# Altium PCB Switch_Matrix_32_2.PCBDOC (part 5 of 9)
Units mm, origin at the board's own origin, x right, y up, seen from the top; angles counter-clockwise.
Board outline 222.54 x 100 mm, 6 copper layers (L1, P2, L3, P4, L5, L6), stack 1.61 mm thick; 629 components, 583 nets, 2332 pads, 825 vias.
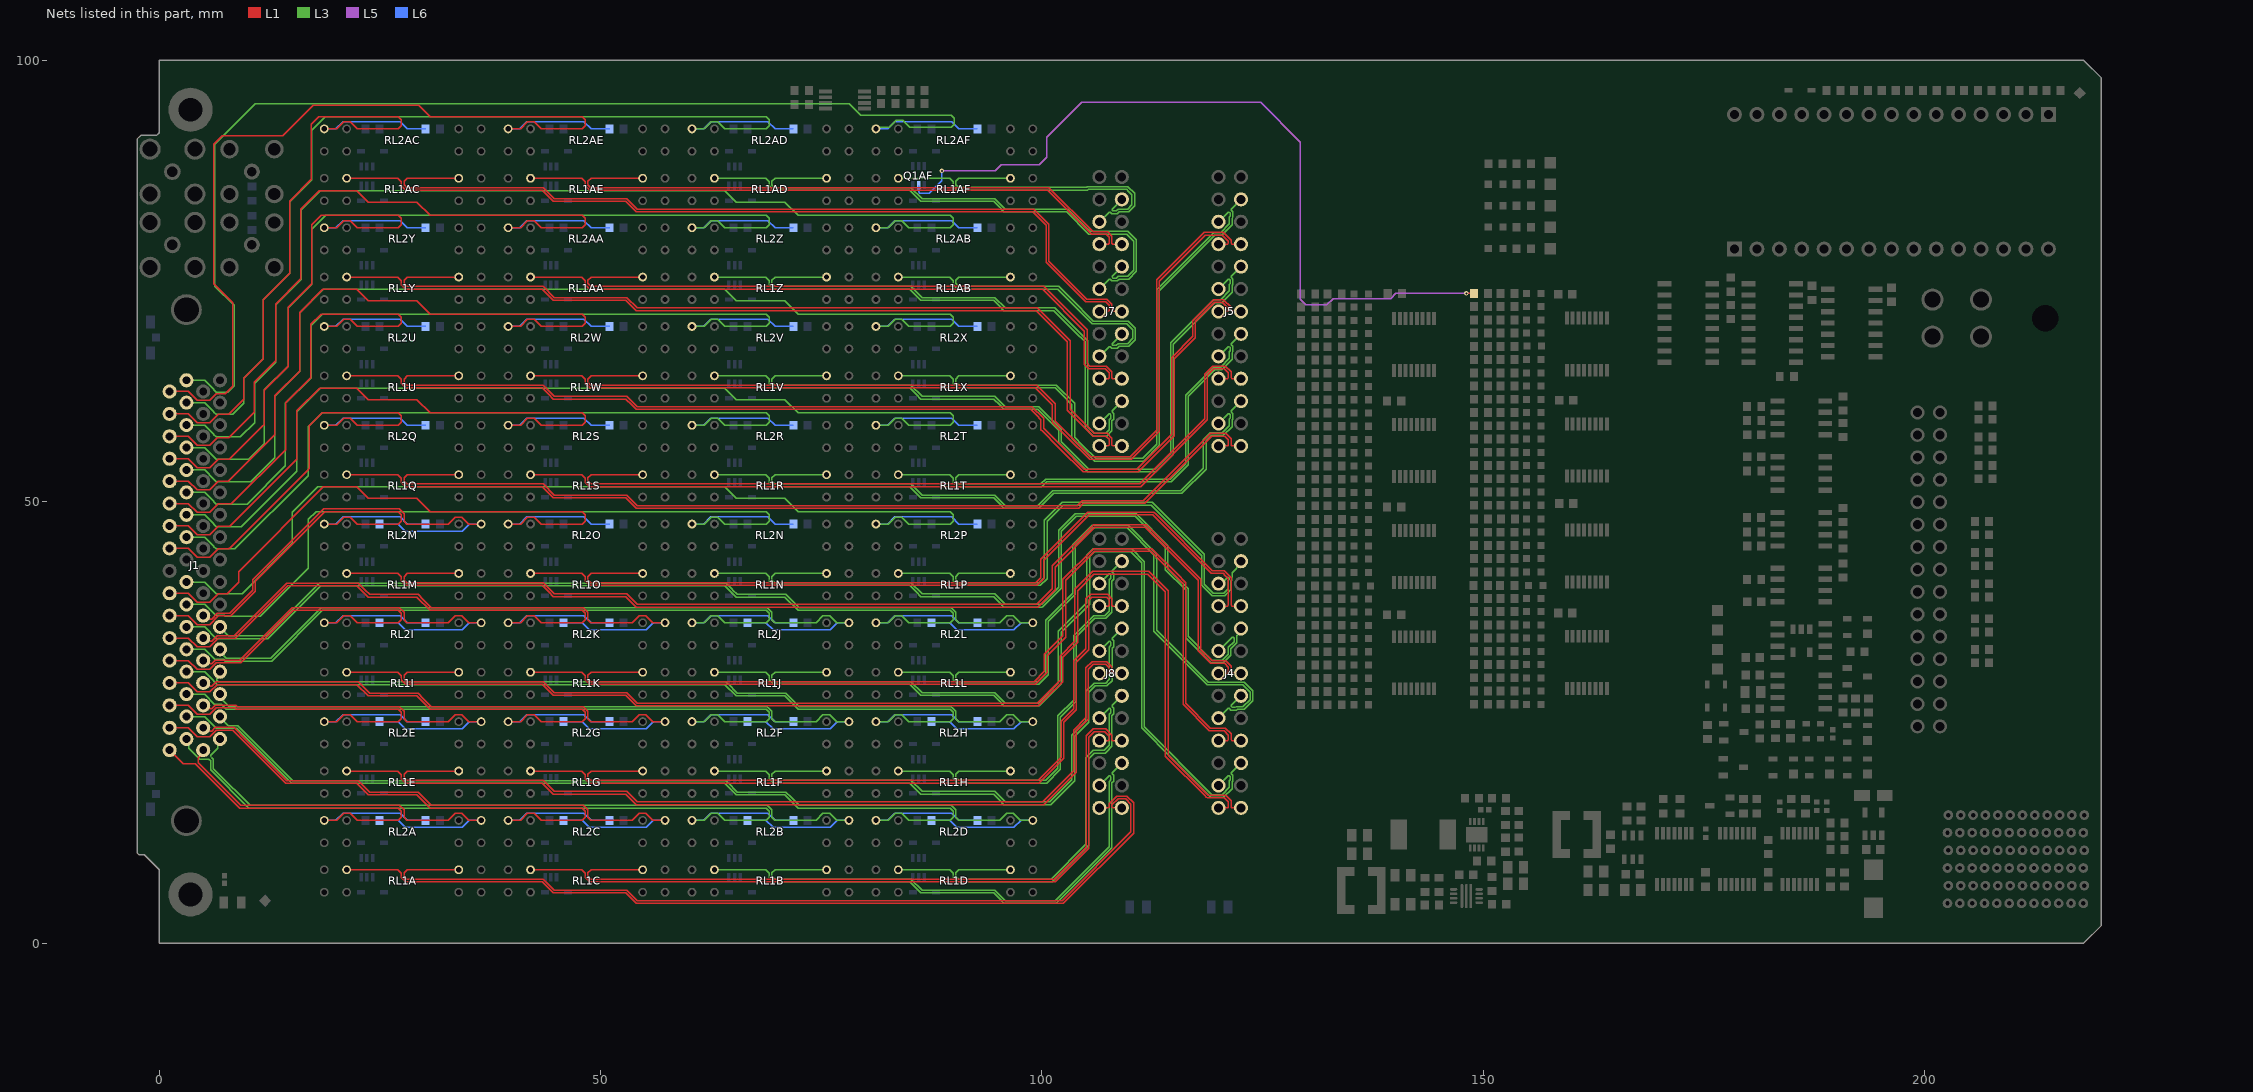
[diagram p8: the nets of this part, all layers, seen from the top]

## Via types
v1: diameter 0.5, hole 0.2, L1 to L6, tented both sides, 775 vias
v2: diameter 0.7, hole 0.4, L1 to L6, tented both sides, 41 vias
v3: diameter 0.5, hole 0.2, L1 to L6, 5 vias
v4: diameter 0.6, hole 0.3, L1 to L6, tented both sides, 4 vias

## Nets (pads, with @x,y where several pads share a name; then routed paths per layer and width w, separated by ;. In a path a pad name is that pad's centre, name@x,y a point inside that pad or via, vN(x,y) a via of type N, cw(c..) or ccw(c..) an arc to the next point about the centre after c; other vN are vias at no path point) (continued)
CTRL32B: Q1AF.2 R68B.2 | length 90.4
  L1 w0.152: v1(148.1,73.6) R68B.2@148.95,73.6
  L5 w0.152: v1(88.682,87.478) 94.704,87.478 95.397,88.171 99.702,88.171 100.531,89 100.531,91.282 104.505,95.256 124.772,95.256 129.289,90.739 129.289,72.911 129.9,72.3 132.3,72.3 133,73 139.5,73 140.1,73.6 v1(148.1,73.6)
  L6 w0.152: Q1AF.2@86.035,85.778 86.035,85.112 86.192,84.955 87.264,84.955 88.682,86.373 v1(88.682,87.478)
DAC_IN_N1: J8.2 RL1A.7 | length 102.7
  L1 w0.152: RL1A.7@21.234,8.3 27.031,8.3 27.432,7.899 27.432,7.448 27.945,6.935 43.37,6.935 44.107,6.198 44.63,5.675 52.859,5.675 53.534,5 54.039,4.495 102.426,4.495 110.391,12.46 110.391,15.868 109.61,16.65 108.505,16.65 107.635,15.779 107.635,15.405 107.546,15.316 J8.2@106.517,15.316
DAC_IN_N2: J8.5 RL1B.7 | length 59.7
  L3 w0.152: RL1B.7@62.906,8.3 68.703,8.3 69.104,7.899 69.104,7.448 69.617,6.935 85.042,6.935 85.779,6.198 86.302,5.675 94.531,5.675 95.206,5 95.711,4.495 101.626,4.495 107.935,10.804 107.935,18.153 108.137,18.354 108.137,18.992 107.958,19.171 107.958,19.297 J8.5@109.057,20.396
DAC_IN_N3: J8.8 RL1C.7 | length 82.6
  L1 w0.152: RL1C.7@42.07,8.3 47.867,8.3 48.268,7.899 48.268,7.448 48.781,6.935 101.526,6.935 105.326,10.735 105.326,23.335 105.956,23.965 107.113,23.965 107.635,23.443 107.635,23.025 107.546,22.936 J8.8@106.517,22.936
DAC_IN_N4: J8.11 RL1D.7 | length 43.5
  L3 w0.152: RL1D.7@83.742,8.3 89.539,8.3 89.94,7.899 89.94,7.448 90.453,6.935 101.166,6.935 105.305,11.074 105.305,20.874 105.949,21.518 107.17,21.518 107.349,21.697 107.93,22.279 107.93,25.768 108.137,25.974 108.137,26.612 107.958,26.791 107.958,26.917 J8.11@109.057,28.016
DAC_IN_N5: J8.14 RL1E.7 | length 102.7
  L1 w0.152: RL1E.7@21.234,19.492 27.031,19.492 27.432,19.091 27.432,18.64 27.945,18.127 43.37,18.127 44.107,17.39 44.63,16.867 52.859,16.867 53.534,16.192 54.039,15.687 100.214,15.687 100.392,15.866 103.721,19.195 103.9,19.374 103.9,24 105.271,25.371 105.271,31.04 105.815,31.585 107.213,31.585 107.635,31.163 107.635,30.645 107.546,30.556 J8.14@106.517,30.556
DAC_IN_N6: J8.17 RL1F.7 | length 64.1
  L3 w0.152: RL1F.7@62.906,19.492 68.703,19.492 69.104,19.091 69.104,18.64 69.617,18.127 85.042,18.127 85.779,17.39 86.302,16.867 94.531,16.867 95.206,16.192 95.711,15.687 101.018,15.687 103.705,18.374 103.705,23.405 105.126,24.826 105.305,25.005 105.305,28.387 106.047,29.13 107.337,29.13 107.951,29.743 107.951,33.408 108.137,33.594 108.137,34.232 107.958,34.411 107.958,34.537 J8.17@109.057,35.636
DAC_IN_N7: J8.20 RL1G.7 | length 85.9
  L1 w0.152: RL1G.7@42.07,19.492 47.867,19.492 48.268,19.091 48.268,18.64 48.781,18.127 99.713,18.127 99.891,18.306 102.326,20.741 102.505,20.919 102.505,25.005 103.905,26.405 103.905,31.836 105.126,33.057 105.305,33.236 105.305,38.855 105.655,39.205 107.33,39.205 107.635,38.9 107.635,38.265 107.546,38.176 J8.20@106.517,38.176
DAC_IN_N8: J8.23 RL1H.7 | length 47.2
  L3 w0.152: RL1H.7@83.742,19.492 89.539,19.492 89.94,19.091 89.94,18.64 90.453,18.127 100.558,18.127 102.105,19.674 102.105,25.605 103.726,27.226 103.905,27.405 103.905,34.685 105.993,36.773 107.231,36.773 107.753,37.296 107.932,37.474 107.932,41.009 108.137,41.214 108.137,41.852 107.958,42.031 107.958,42.157 J8.23@109.057,43.256
DAC_IN_N9: J4.2 RL1I.7 | length 136.3
  L1 w0.152: RL1I.7@21.234,30.684 27.031,30.684 27.432,30.283 27.432,29.832 27.945,29.319 43.37,29.319 44.107,28.582 44.63,28.059 52.859,28.059 53.534,27.384 54.039,26.879 99.618,26.879 100.563,27.824 102.364,29.625 102.364,32.382 103.862,33.88 104.04,34.058 104.04,39.938 105.902,41.8 112,41.8 114,39.8 114,21.158 114.179,20.979 118.431,16.727 118.628,16.53 118.717,16.441 120.693,16.441 121.135,15.999 121.135,15.405 121.046,15.316 J4.2@120.017,15.316
DAC_IN_N10: J4.5 RL1J.7 | length 100.7
  L3 w0.152: RL1J.7@62.906,30.684 68.703,30.684 69.104,30.283 69.104,29.832 69.617,29.319 85.042,29.319 85.779,28.582 86.302,28.059 94.531,28.059 95.206,27.384 95.711,26.879 99.71,26.879 102.19,29.359 102.19,35.19 105.405,38.405 105.405,43.807 105.955,44.358 110.042,44.358 110.2,44.2 111.3,43.1 111.3,24.369 114.784,20.884 119.146,16.523 120.57,16.523 121.554,17.507 121.554,18.272 121.637,18.354 121.637,18.992 121.458,19.171 121.458,19.297 J4.5@122.557,20.396
DAC_IN_N11: J4.8 RL1K.7 | length 109.3
  L1 w0.152: RL1K.7@42.07,30.684 47.867,30.684 48.268,30.283 48.268,29.832 48.781,29.319 99.262,29.319 100.605,30.662 100.605,32.574 102.514,34.483 102.692,34.662 102.692,41.083 105.979,44.37 112.33,44.37 115.1,41.6 116,40.7 116,27.035 116.179,26.856 118.801,24.234 118.98,24.055 120.647,24.055 121.135,23.567 121.135,23.025 121.046,22.936 J4.8@120.017,22.936
DAC_IN_N12: J4.11 RL1L.7 | length 72.6
  L3 w0.152: RL1L.7@83.742,30.684 89.539,30.684 89.94,30.283 89.94,29.832 90.453,29.319 99.65,29.319 100.731,30.399 100.731,36.46 103.608,39.337 103.786,39.516 103.786,44.987 105.835,47.036 109.665,47.036 112.689,44.012 112.689,35.311 118.752,29.248 122.78,29.248 123.586,28.442 123.586,27.59 122.78,26.784 122.016,26.784 121.933,26.702 121.548,26.702 121.458,26.791 121.458,26.917 J4.11@122.557,28.016
DAC_IN_N13: J4.14 RL1M.7 | length 120
  L1 w0.152: RL1M.7@21.234,41.876 27.031,41.876 27.432,41.475 27.432,41.024 27.945,40.511 43.37,40.511 44.107,39.774 44.63,39.251 52.859,39.251 53.534,38.576 54.039,38.071 99.53,38.071 101.5,40.041 101.5,42.6 106,47.1 111.7,47.1 117.7,41.1 117.7,33.13 117.879,32.951 118.973,31.857 119.151,31.678 120.701,31.678 121.135,31.244 121.135,30.645 121.046,30.556 J4.14@120.017,30.556
DAC_IN_N14: J4.17 RL1N.7 | length 83.8
  L3 w0.152: RL1N.7@62.906,41.876 68.703,41.876 69.104,41.475 69.104,41.024 69.617,40.511 85.042,40.511 85.779,39.774 86.302,39.251 94.531,39.251 95.206,38.576 95.711,38.071 100.034,38.071 100.06,38.097 100.114,38.097 100.278,38.26 102.049,40.032 102.213,40.195 102.213,46.646 103.903,48.336 110.586,48.336 114,44.923 114,42.295 116.295,40 116.295,34.606 116.474,34.427 119.138,31.763 120.57,31.763 121.407,32.6 121.407,33.364 122.075,34.032 122.075,34.823 122.557,35.306 J4.17@122.557,35.636
DAC_IN_N15: J4.20 RL1O.7 | length 91.6
  L1 w0.152: RL1O.7@42.07,41.876 47.867,41.876 48.268,41.475 48.268,41.024 48.781,40.511 99.442,40.511 100.205,41.274 100.205,43.356 105.347,48.498 112.571,48.498 119.2,41.87 120.53,41.87 120.8,41.6 121.135,41.265 121.135,38.265 121.046,38.176 J4.20@120.017,38.176
DAC_IN_N16: J4.23 RL1P.7 | length 56.3
  L3 w0.152: RL1P.7@83.742,41.876 89.539,41.876 89.94,41.475 89.94,41.024 90.453,40.511 99.842,40.511 100.605,41.274 100.605,47.798 102.435,49.628 112.372,49.628 118.095,43.905 118.095,40.541 118.274,40.363 119.107,39.53 119.286,39.351 120.731,39.351 121.421,40.04 121.421,40.998 121.54,41.118 121.54,41.42 121.58,41.459 121.58,41.98 122.557,42.957 J4.23@122.557,43.256
DAC_IN_N17: J5.2 RL1Q.7 | length 107.1
  L1 w0.152: RL1Q.7@21.234,53.068 27.031,53.068 27.432,52.667 27.432,52.216 27.945,51.703 43.37,51.703 44.107,50.966 44.63,50.443 52.859,50.443 53.534,49.768 54.039,49.263 104.163,49.263 104.7,49.8 111.631,49.8 119.27,57.439 120.727,57.439 121.135,57.031 121.135,56.405 121.046,56.316 J5.2@120.017,56.316
DAC_IN_N18: J5.5 RL1R.7 | length 69.7
  L3 w0.152: RL1R.7@62.906,53.068 68.703,53.068 69.104,52.667 69.104,52.216 69.617,51.703 85.042,51.703 85.779,50.966 86.302,50.443 94.531,50.443 95.206,49.768 95.711,49.263 99.663,49.263 101.338,50.938 115.869,50.938 118.605,53.674 118.605,56.9 119.228,57.523 120.57,57.523 121.554,58.507 121.554,59.272 121.637,59.354 121.637,59.992 121.458,60.171 121.458,60.297 J5.5@122.557,61.396
DAC_IN_N19: J5.8 RL1S.7 | length 90.3
  L1 w0.152: RL1S.7@42.07,53.068 47.867,53.068 48.268,52.667 48.268,52.216 48.781,51.703 111.195,51.703 118.583,59.092 118.762,59.27 118.762,64.321 119.501,65.06 120.677,65.06 121.135,64.602 121.135,64.025 121.046,63.936 J5.8@120.017,63.936
DAC_IN_N20: J5.11 RL1T.7 | length 52.6
  L3 w0.152: RL1T.7@83.742,53.068 89.539,53.068 89.94,52.667 89.94,52.216 90.453,51.703 100.003,51.703 100.548,52.248 114.679,52.248 116.605,54.174 116.605,61.942 119.602,64.939 120.366,64.939 121.554,66.127 121.554,66.892 121.637,66.974 121.637,67.612 121.458,67.791 121.458,67.917 J5.11@122.557,69.016
DAC_IN_N21: J5.14 RL1U.7 | length 121.1
  L1 w0.152: RL1U.7@21.234,64.26 27.031,64.26 27.432,63.859 27.432,63.408 27.945,62.895 43.37,62.895 44.107,62.158 44.63,61.635 52.859,61.635 53.534,60.96 54.039,60.455 98.745,60.455 99.4,59.8 99.895,59.305 99.895,58.174 100.074,57.995 101.815,56.254 102.102,55.967 104.674,53.395 110.906,53.395 111.084,53.574 114.826,57.316 115.005,57.494 115.005,66.2 117.406,68.601 117.406,70.399 119.591,72.585 120.443,72.585 121.135,71.893 121.135,71.645 121.046,71.556 J5.14@120.017,71.556
DAC_IN_N22: J5.17 RL1V.7 | length 83.5
  L3 w0.152: RL1V.7@62.906,64.26 68.703,64.26 69.104,63.859 69.104,63.408 69.617,62.895 85.042,62.895 85.779,62.158 86.302,61.635 94.531,61.635 95.206,60.96 95.711,60.455 99.54,60.455 101.895,58.1 101.895,56.674 105.186,53.383 112.914,53.383 114.905,55.374 114.905,67.862 119.602,72.559 120.366,72.559 121.554,73.747 121.554,74.512 121.637,74.594 121.637,75.232 121.458,75.411 121.458,75.537 J5.17@122.557,76.636
DAC_IN_N23: J5.20 RL1W.7 | length 106.6
  L1 w0.152: RL1W.7@42.07,64.26 47.867,64.26 48.268,63.859 48.268,63.408 48.781,62.895 99.278,62.895 101.195,60.978 101.195,59.014 101.374,58.836 102.878,57.332 105.414,54.795 110.113,54.795 110.292,54.974 113.128,57.81 113.307,57.988 113.307,74.993 118.518,80.205 120.443,80.205 121.135,79.513 121.135,79.265 121.046,79.176 J5.20@120.017,79.176
DAC_IN_N24: J5.23 RL1X.7 | length 69.1
  L3 w0.152: RL1X.7@83.742,64.26 89.539,64.26 89.94,63.859 89.94,63.408 90.453,62.895 101.505,62.895 102.3,62.1 103.395,61.005 103.395,57.174 105.969,54.6 111.531,54.6 113.305,56.374 113.305,73.882 119.602,80.179 120.366,80.179 121.554,81.367 121.554,82.132 121.637,82.214 121.637,82.852 121.458,83.031 121.458,83.157 J5.23@122.557,84.256
DAC_IN_N25: J7.2 RL1Y.7 | length 100.6
  L1 w0.152: RL1Y.7@21.234,75.452 27.031,75.452 27.432,75.051 27.432,74.6 27.945,74.087 43.37,74.087 44.107,73.35 44.63,72.827 52.859,72.827 53.534,72.152 54.039,71.647 99.353,71.647 99.9,71.1 102.9,68.1 102.9,60.364 105.829,57.436 107.259,57.436 107.635,57.06 107.635,56.405 107.546,56.316 J7.2@106.517,56.316
DAC_IN_N26: J7.5 RL1Z.7 | length 62.7
  L3 w0.152: RL1Z.7@62.906,75.452 68.703,75.452 69.104,75.051 69.104,74.6 69.617,74.087 85.042,74.087 85.779,73.35 86.302,72.827 94.531,72.827 95.206,72.152 95.711,71.647 101.353,71.647 103.8,69.2 104.895,68.105 104.895,58.374 105.829,57.44 107.34,57.44 107.932,58.032 107.932,59.149 108.137,59.354 108.137,59.992 107.958,60.171 107.958,60.297 J7.5@109.057,61.396
DAC_IN_N27: J7.8 RL1AA.7 | length 74.3
  L1 w0.152: RL1AA.7@42.07,75.452 47.867,75.452 48.268,75.051 48.268,74.6 48.781,74.087 100.082,74.087 104.828,69.341 104.828,65.567 105.327,65.067 107.176,65.067 107.635,64.608 107.635,64.025 107.546,63.936 J7.8@106.517,63.936
DAC_IN_N28: J7.11 RL1AB.7 | length 34.7
  L3 w0.152: RL1AB.7@83.742,75.452 89.539,75.452 89.94,75.051 89.94,74.6 90.453,74.087 101.782,74.087 105.714,70.155 109.645,70.155 110.3,69.5 110.3,68.5 109.707,67.907 108.638,67.907 108.433,67.702 108.048,67.702 107.958,67.791 107.958,67.917 J7.11@109.057,69.016
DAC_IN_N29: J7.14 RL1AC.7 | length 96.8
  L1 w0.152: RL1AC.7@21.234,86.644 27.031,86.644 27.432,86.243 27.432,85.792 27.945,85.279 43.37,85.279 44.107,84.542 44.63,84.019 52.859,84.019 53.534,83.344 54.039,82.839 98.964,82.839 100.495,81.308 100.495,77.129 100.674,76.951 102.874,74.75 103.269,74.356 104.786,72.839 104.964,72.66 107.249,72.66 107.635,72.274 107.635,71.645 107.546,71.556 J7.14@106.517,71.556
DAC_IN_N30: J7.17 RL1AD.7 | length 58.5
  L3 w0.152: RL1AD.7@62.906,86.644 68.703,86.644 69.104,86.243 69.104,85.792 69.617,85.279 85.042,85.279 85.779,84.542 86.302,84.019 94.531,84.019 95.206,83.344 95.711,82.839 102.83,82.839 105.339,80.33 109.599,80.33 110.4,79.528 110.4,76.222 109.705,75.527 108.638,75.527 108.433,75.322 108.048,75.322 107.958,75.411 107.958,75.537 J7.17@109.057,76.636
DAC_IN_N31: J7.20 RL1AE.7 | length 70.5
  L1 w0.152: RL1AE.7@42.07,86.644 47.867,86.644 48.268,86.243 48.268,85.792 48.781,85.279 100.683,85.279 105.499,80.463 105.677,80.285 107.318,80.285 107.635,79.968 107.635,79.265 107.546,79.176 J7.20@106.517,79.176
DAC_IN_N32: J7.23 RL1AF.7 | length 33
  L3 w0.152: RL1AF.7@83.742,86.644 89.539,86.644 89.94,86.243 89.94,85.792 90.437,85.295 105.195,85.295 105.276,85.376 109.624,85.376 109.8,85.2 110.2,84.8 110.2,83.642 109.705,83.147 108.638,83.147 108.433,82.942 108.048,82.942 107.958,83.031 107.958,83.157 J7.23@109.057,84.256
DAC_IN_P1: J8.1 RL1A.6 | length 100.7
  L1 w0.152: RL1A.6@33.934,8.3 28.097,8.3 27.736,7.939 27.736,7.574 28.071,7.24 43.496,7.24 44.756,5.98 52.985,5.98 54.165,4.8 102.3,4.8 110.086,12.586 110.086,15.742 109.483,16.345 108.631,16.345 107.94,15.653 107.94,15.405 108.029,15.316 J8.1@109.057,15.316
DAC_IN_P2: J8.4 RL1B.6 | length 58.4
  L3 w0.152: RL1B.6@75.606,8.3 69.769,8.3 69.408,7.939 69.408,7.574 69.743,7.24 85.168,7.24 86.428,5.98 94.657,5.98 95.837,4.8 101.5,4.8 107.63,10.93 107.63,18.279 107.832,18.481 107.832,18.866 107.743,18.955 107.617,18.955 J8.4@106.517,17.856
DAC_IN_P3: J8.7 RL1C.6 | length 82.6
  L1 w0.152: RL1C.6@54.77,8.3 48.933,8.3 48.572,7.939 48.572,7.574 48.907,7.24 101.4,7.24 105.021,10.861 105.021,23.461 105.829,24.27 107.24,24.27 107.94,23.569 107.94,23.025 108.029,22.936 J8.7@109.057,22.936
DAC_IN_P4: J8.10 RL1D.6 | length 42.2
  L3 w0.152: RL1D.6@96.442,8.3 90.605,8.3 90.244,7.939 90.244,7.574 90.579,7.24 101.04,7.24 105,11.2 105,21 105.823,21.823 107.044,21.823 107.626,22.405 107.626,25.894 107.832,26.101 107.832,26.486 107.743,26.575 107.617,26.575 J8.10@106.517,25.476
DAC_IN_P5: J8.13 RL1E.6 | length 102.7
  L1 w0.152: RL1E.6@33.934,19.492 28.097,19.492 27.736,19.131 27.736,18.766 28.071,18.432 43.496,18.432 44.756,17.172 52.985,17.172 54.165,15.992 100.087,15.992 103.595,19.5 103.595,24.126 104.966,25.497 104.966,31.167 105.689,31.89 107.34,31.89 107.94,31.289 107.94,30.645 108.029,30.556 J8.13@109.057,30.556
DAC_IN_P6: J8.16 RL1F.6 | length 62.9
  L3 w0.152: RL1F.6@75.606,19.492 69.769,19.492 69.408,19.131 69.408,18.766 69.743,18.432 85.168,18.432 86.428,17.172 94.657,17.172 95.837,15.992 100.892,15.992 103.4,18.5 103.4,23.531 105,25.131 105,28.514 105.921,29.435 107.211,29.435 107.646,29.87 107.646,33.535 107.832,33.721 107.832,34.106 107.743,34.195 107.617,34.195 J8.16@106.517,33.096
DAC_IN_P7: J8.19 RL1G.6 | length 85.9
  L1 w0.152: RL1G.6@54.77,19.492 48.933,19.492 48.572,19.131 48.572,18.766 48.907,18.432 99.586,18.432 102.2,21.046 102.2,25.131 103.6,26.531 103.6,31.962 105,33.362 105,38.981 105.529,39.51 107.457,39.51 107.94,39.026 107.94,38.265 108.029,38.176 J8.19@109.057,38.176
DAC_IN_P8: J8.22 RL1H.6 | length 45.9
  L3 w0.152: RL1H.6@96.442,19.492 90.605,19.492 90.244,19.131 90.244,18.766 90.579,18.432 100.432,18.432 101.8,19.8 101.8,25.731 103.6,27.531 103.6,34.811 105.867,37.078 107.105,37.078 107.627,37.601 107.627,41.136 107.832,41.341 107.832,41.726 107.743,41.815 107.617,41.815 J8.22@106.517,40.716
DAC_IN_P9: J4.1 RL1I.6 | length 136.4
  L1 w0.152: RL1I.6@33.934,30.684 28.097,30.684 27.736,30.323 27.736,29.958 28.071,29.624 43.496,29.624 44.756,28.364 52.985,28.364 54.165,27.184 99.492,27.184 102.059,29.751 102.059,32.508 103.735,34.184 103.735,40.064 105.776,42.105 112.126,42.105 114.216,40.016 114.305,39.926 114.305,21.284 118.843,16.746 120.819,16.746 121.44,16.125 121.44,15.405 121.529,15.316 J4.1@122.557,15.316
DAC_IN_P10: J4.4 RL1J.6 | length 99.4
  L3 w0.152: RL1J.6@75.606,30.684 69.769,30.684 69.408,30.323 69.408,29.958 69.743,29.624 85.168,29.624 86.428,28.364 94.657,28.364 95.837,27.184 99.584,27.184 101.885,29.485 101.885,35.316 105.1,38.531 105.1,43.933 105.829,44.663 110.169,44.663 111.605,43.226 111.605,24.495 119.272,16.828 120.443,16.828 121.249,17.634 121.249,18.398 121.332,18.481 121.332,18.866 121.243,18.955 121.117,18.955 J4.4@120.017,17.856
DAC_IN_P11: J4.7 RL1K.6 | length 109.4
  L1 w0.152: RL1K.6@54.77,30.684 48.933,30.684 48.572,30.323 48.572,29.958 48.907,29.624 99.136,29.624 100.3,30.788 100.3,32.701 102.387,34.788 102.387,41.209 105.853,44.675 112.456,44.675 112.545,44.586 115.316,41.816 116.305,40.826 116.305,27.161 119.106,24.36 120.773,24.36 121.44,23.694 121.44,23.025 121.529,22.936 J4.7@122.557,22.936
DAC_IN_P12: J4.10 RL1L.6 | length 73.4
  L3 w0.152: RL1L.6@96.442,30.684 90.605,30.684 90.244,30.323 90.244,29.958 90.579,29.624 99.524,29.624 100.426,30.526 100.426,36.586 103.481,39.642 103.481,44.969 103.507,44.994 103.507,45.12 103.66,45.274 103.678,45.274 105.72,47.315 109.78,47.315 112.968,44.127 112.968,43.537 112.993,43.511 112.993,35.438 118.878,29.553 122.906,29.553 123.891,28.569 123.891,27.464 122.906,26.479 122.142,26.479 122.059,26.397 121.421,26.397 121.243,26.575 121.117,26.575 J4.10@120.017,25.476
DAC_IN_P13: J4.13 RL1M.6 | length 120
  L1 w0.152: RL1M.6@33.934,41.876 28.097,41.876 27.736,41.515 27.736,41.15 28.071,40.816 43.496,40.816 44.756,39.556 52.985,39.556 54.165,38.376 99.403,38.376 101.195,40.168 101.195,42.726 105.874,47.405 111.826,47.405 118.005,41.226 118.005,33.256 119.278,31.983 120.827,31.983 121.44,31.371 121.44,30.645 121.529,30.556 J4.13@122.557,30.556
DAC_IN_P14: J4.16 RL1N.6 | length 83.9
  L3 w0.152: RL1N.6@75.606,41.876 69.769,41.876 69.408,41.515 69.408,41.15 69.743,40.816 85.168,40.816 86.428,39.556 94.657,39.556 95.837,38.376 99.998,38.376 101.933,40.311 101.933,46.761 103.788,48.616 110.702,48.616 114.279,45.038 114.279,42.411 115.866,40.824 115.902,40.824 116.6,40.126 116.6,34.732 119.264,32.068 120.443,32.068 121.102,32.726 121.102,33.491 121.77,34.158 121.77,34.544 121.68,34.633 121.554,34.633 J4.16@120.017,33.096
DAC_IN_P15: J4.19 RL1O.6 | length 91.6
  L1 w0.152: RL1O.6@54.77,41.876 48.933,41.876 48.572,41.515 48.572,41.15 48.907,40.816 99.316,40.816 99.9,41.4 99.9,43.482 105.221,48.803 112.697,48.803 112.876,48.624 119.326,42.174 120.657,42.174 121.44,41.391 121.44,38.265 121.529,38.176 J4.19@122.557,38.176
DAC_IN_P16: J4.22 RL1P.6 | length 54.6
  L3 w0.152: RL1P.6@96.442,41.876 90.605,41.876 90.244,41.515 90.244,41.15 90.579,40.816 99.716,40.816 100.3,41.4 100.3,47.924 102.309,49.933 112.498,49.933 118.4,44.031 118.4,40.668 119.412,39.656 120.605,39.656 121.116,40.167 121.116,41.124 121.235,41.244 121.235,41.37 121.146,41.459 121.059,41.459 120.316,40.716 J4.22@120.017,40.716
DAC_IN_P17: J5.1 RL1Q.6 | length 107.1
  L1 w0.152: RL1Q.6@33.934,53.068 28.097,53.068 27.736,52.707 27.736,52.342 28.071,52.008 43.496,52.008 44.756,50.748 52.985,50.748 54.165,49.568 104.037,49.568 104.574,50.105 111.505,50.105 119.144,57.744 120.853,57.744 121.44,57.157 121.44,56.405 121.529,56.316 J5.1@122.557,56.316
DAC_IN_P18: J5.4 RL1R.6 | length 68.4
  L3 w0.152: RL1R.6@75.606,53.068 69.769,53.068 69.408,52.707 69.408,52.342 69.743,52.008 85.168,52.008 86.428,50.748 94.657,50.748 95.837,49.568 99.537,49.568 101.212,51.243 115.743,51.243 118.3,53.8 118.3,57.026 119.101,57.828 120.443,57.828 121.249,58.634 121.249,59.398 121.332,59.481 121.332,59.866 121.243,59.955 121.117,59.955 J5.4@120.017,58.856
DAC_IN_P19: J5.7 RL1S.6 | length 90.3
  L1 w0.152: RL1S.6@54.77,53.068 48.933,53.068 48.572,52.707 48.572,52.342 48.907,52.008 111.068,52.008 118.457,59.397 118.457,64.447 119.375,65.365 120.804,65.365 121.44,64.728 121.44,64.025 121.529,63.936 J5.7@122.557,63.936
DAC_IN_P20: J5.10 RL1T.6 | length 51.4
  L3 w0.152: RL1T.6@96.442,53.068 90.605,53.068 90.244,52.707 90.244,52.342 90.579,52.008 99.877,52.008 100.422,52.553 114.553,52.553 116.3,54.3 116.3,62.069 119.476,65.244 120.24,65.244 121.249,66.254 121.249,67.018 121.332,67.101 121.332,67.486 121.243,67.575 121.117,67.575 J5.10@120.017,66.476
DAC_IN_P21: J5.13 RL1U.6 | length 121.1
  L1 w0.152: RL1U.6@33.934,64.26 28.097,64.26 27.736,63.899 27.736,63.534 28.071,63.2 43.496,63.2 44.756,61.94 52.985,61.94 54.165,60.76 98.871,60.76 100.2,59.431 100.2,58.3 102.12,56.38 102.228,56.272 104.8,53.7 110.78,53.7 114.7,57.62 114.7,66.326 117.101,68.727 117.101,70.526 119.465,72.89 120.57,72.89 121.44,72.02 121.44,71.645 121.529,71.556 J5.13@122.557,71.556
DAC_IN_P22: J5.16 RL1V.6 | length 82.2
  L3 w0.152: RL1V.6@75.606,64.26 69.769,64.26 69.408,63.899 69.408,63.534 69.743,63.2 85.168,63.2 86.428,61.94 94.657,61.94 95.837,60.76 99.666,60.76 102.2,58.226 102.2,56.8 103.792,55.208 103.9,55.1 105.312,53.688 112.788,53.688 114.6,55.5 114.6,67.989 119.476,72.864 120.24,72.864 121.249,73.874 121.249,74.638 121.332,74.721 121.332,75.106 121.243,75.195 121.117,75.195 J5.16@120.017,74.096
DAC_IN_P23: J5.19 RL1W.6 | length 106.6
  L1 w0.152: RL1W.6@54.77,64.26 48.933,64.26 48.572,63.899 48.572,63.534 48.907,63.2 99.404,63.2 101.5,61.104 101.5,59.141 103.004,57.637 105.541,55.1 109.987,55.1 113.002,58.114 113.002,75.12 118.392,80.51 120.57,80.51 121.44,79.64 121.44,79.265 121.529,79.176 J5.19@122.557,79.176
DAC_IN_P24: J5.22 RL1X.6 | length 67.9
  L3 w0.152: RL1X.6@96.442,64.26 90.605,64.26 90.244,63.899 90.244,63.534 90.579,63.2 101.631,63.2 103.7,61.131 103.7,57.3 104.592,56.408 104.7,56.3 106.095,54.905 111.405,54.905 113,56.5 113,74.009 119.476,80.484 120.24,80.484 121.249,81.494 121.249,82.258 121.332,82.341 121.332,82.726 121.243,82.815 121.117,82.815 J5.22@120.017,81.716
DAC_IN_P25: J7.1 RL1Y.6 | length 100.6
  L1 w0.152: RL1Y.6@33.934,75.452 28.097,75.452 27.736,75.091 27.736,74.726 28.071,74.392 43.496,74.392 44.756,73.132 52.985,73.132 54.165,71.952 99.479,71.952 103.205,68.226 103.205,60.491 105.955,57.74 107.386,57.74 107.94,57.186 107.94,56.405 108.029,56.316 J7.1@109.057,56.316
DAC_IN_P26: J7.4 RL1Z.6 | length 61.4
  L3 w0.152: RL1Z.6@75.606,75.452 69.769,75.452 69.408,75.091 69.408,74.726 69.743,74.392 85.168,74.392 86.428,73.132 94.657,73.132 95.837,71.952 101.479,71.952 105.2,68.231 105.2,58.5 105.955,57.745 107.214,57.745 107.627,58.158 107.627,59.276 107.832,59.481 107.832,59.866 107.743,59.955 107.617,59.955 J7.4@106.517,58.856
DAC_IN_P27: J7.7 RL1AA.6 | length 74.3
  L1 w0.152: RL1AA.6@54.77,75.452 48.933,75.452 48.572,75.091 48.572,74.726 48.907,74.392 100.208,74.392 105.132,69.468 105.132,65.693 105.453,65.372 107.302,65.372 107.94,64.734 107.94,64.025 108.029,63.936 J7.7@109.057,63.936
DAC_IN_P28: J7.10 RL1AB.6 | length 35.5
  L3 w0.152: RL1AB.6@96.442,75.452 90.605,75.452 90.244,75.091 90.244,74.726 90.579,74.392 101.908,74.392 104.492,71.808 104.6,71.7 105.84,70.46 109.771,70.46 110.605,69.626 110.605,68.374 109.833,67.602 108.764,67.602 108.559,67.397 107.921,67.397 107.743,67.575 107.617,67.575 J7.10@106.517,66.476
DAC_IN_P29: J7.13 RL1AC.6 | length 96.9
  L1 w0.152: RL1AC.6@33.934,86.644 28.097,86.644 27.736,86.283 27.736,85.918 28.071,85.584 43.496,85.584 44.756,84.324 52.985,84.324 54.165,83.144 99.09,83.144 100.8,81.434 100.8,77.256 103.179,74.876 103.395,74.661 105.09,72.965 107.375,72.965 107.94,72.4 107.94,71.645 108.029,71.556 J7.13@109.057,71.556
DAC_IN_P30: J7.16 RL1AD.6 | length 59.3
  L3 w0.152: RL1AD.6@75.606,86.644 69.769,86.644 69.408,86.283 69.408,85.918 69.743,85.584 85.168,85.584 86.428,84.324 94.657,84.324 95.837,83.144 102.956,83.144 104.874,81.226 105.466,80.634 109.725,80.634 110.705,79.655 110.705,76.095 109.831,75.222 108.764,75.222 108.559,75.017 107.921,75.017 107.743,75.195 107.617,75.195 J7.16@106.517,74.096
DAC_IN_P31: J7.19 RL1AE.6 | length 70.5
  L1 w0.152: RL1AE.6@54.77,86.644 48.933,86.644 48.572,86.283 48.572,85.918 48.907,85.584 100.809,85.584 105.803,80.589 107.445,80.589 107.94,80.094 107.94,79.265 108.029,79.176 J7.19@109.057,79.176
DAC_IN_P32: J7.22 RL1AF.6 | length 33.7
  L3 w0.152: RL1AF.6@96.442,86.644 90.605,86.644 90.244,86.283 90.244,85.918 90.563,85.599 105.068,85.599 105.15,85.681 109.75,85.681 110.505,84.926 110.505,83.515 109.831,82.842 108.764,82.842 108.559,82.637 107.921,82.637 107.743,82.815 107.617,82.815 J7.22@106.517,81.716
DAC_OUT_N1: J1.35 R99A.1 RL2A.8 | length 51.5
  L1 w0.152: J1.35@1.179,21.851 2.736,20.295 4.111,20.295 7.241,17.165 9.111,15.295 27.093,15.295 27.432,14.956 27.432,14.234 27.094,13.896 22.426,13.896 21.636,14.686 20.891,14.686 20.1,13.896 RL2A.8@18.694,13.896
  L6 w0.152: RL2A.8@18.694,13.896 20.03,13.896 20.834,14.7 27.292,14.7 28.096,13.896 R99A.1@30.19,13.896
DAC_OUT_N2: J1.36 R99B.1 RL2B.8 | length 92.9
  L3 w0.152: J1.36@3.084,23.121 3.329,22.876 3.329,22.093 4.574,20.848 5.622,20.848 5.837,20.632 5.837,19.632 10.174,15.295 18.6,15.295 68.765,15.295 69.104,14.956 69.104,14.234 68.766,13.896 64.098,13.896 63.308,14.686 62.563,14.686 61.772,13.896 RL2B.8@60.366,13.896
  L6 w0.152: RL2B.8@60.366,13.896 61.702,13.896 62.506,14.7 68.964,14.7 69.768,13.896 R99B.1@71.862,13.896
DAC_OUT_N3: J1.37 R99C.1 RL2C.8 | length 74
  L1 w0.152: J1.37@1.179,24.391 3.294,24.391 4.297,23.388 5.743,23.388 6.479,24.124 8.31,24.124 9.756,22.678 14.334,18.1 22.403,18.1 23.703,16.8 29.203,16.8 30.708,15.295 47.929,15.295 48.268,14.956 48.268,14.234 47.93,13.896 43.262,13.896 42.472,14.686 41.727,14.686 40.936,13.896 RL2C.8@39.53,13.896
  L6 w0.152: RL2C.8@39.53,13.896 40.866,13.896 41.67,14.7 48.128,14.7 48.932,13.896 R99C.1@51.026,13.896
DAC_OUT_N4: J1.38 R99D.1 RL2D.8 | length 113.7
  L3 w0.152: J1.38@3.084,25.661 5.138,25.661 6.472,24.328 8.772,24.328 9.5,23.6 15,18.1 18.885,18.1 64.075,18.1 65.375,16.8 70.875,16.8 72.38,15.295 89.601,15.295 89.94,14.956 89.94,14.234 89.602,13.896 84.934,13.896 84.144,14.686 83.399,14.686 82.608,13.896 RL2D.8@81.202,13.896
  L6 w0.152: RL2D.8@81.202,13.896 82.538,13.896 83.342,14.7 89.8,14.7 90.604,13.896 R99D.1@92.698,13.896
DAC_OUT_N5: J1.39 R99E.1 RL2E.8 | length 49.6
  L1 w0.152: J1.39@1.179,26.931 3.294,26.931 4.297,25.928 5.743,25.928 6.479,26.664 8.557,26.664 8.735,26.487 27.093,26.487 27.432,26.148 27.432,25.426 27.094,25.088 22.426,25.088 21.636,25.878 20.891,25.878 20.1,25.088 RL2E.8@18.694,25.088
  L6 w0.152: RL2E.8@18.694,25.088 20.03,25.088 20.834,25.892 27.292,25.892 28.096,25.088 R99E.1@30.19,25.088
DAC_OUT_N6: J1.40 R99F.1 RL2F.8 | length 89.3
  L3 w0.152: J1.40@3.084,28.201 5.138,28.201 6.266,27.074 7.016,27.074 7.603,26.487 17.924,26.487 68.765,26.487 69.104,26.148 69.104,25.426 68.766,25.088 64.098,25.088 63.308,25.878 62.563,25.878 61.772,25.088 RL2F.8@60.366,25.088
  L6 w0.152: RL2F.8@60.366,25.088 61.702,25.088 62.506,25.892 68.964,25.892 69.768,25.088 R99F.1@71.862,25.088
DAC_OUT_N7: J1.41 R99G.1 RL2G.8 | length 71.6
  L1 w0.152: J1.41@1.179,29.471 3.294,29.471 4.297,28.468 5.743,28.468 6.567,29.292 22.403,29.292 23.703,27.992 29.203,27.992 30.708,26.487 47.929,26.487 48.268,26.148 48.268,25.426 47.93,25.088 43.262,25.088 42.472,25.878 41.727,25.878 40.936,25.088 RL2G.8@39.53,25.088
  L6 w0.152: RL2G.8@39.53,25.088 40.866,25.088 41.67,25.892 48.128,25.892 48.932,25.088 R99G.1@51.026,25.088
DAC_OUT_N8: J1.42 R99H.1 RL2H.8 | length 111.2
  L3 w0.152: J1.42@3.084,30.741 5.175,30.741 6.204,29.713 6.204,29.676 6.587,29.292 17.3,29.292 64.075,29.292 65.375,27.992 70.875,27.992 72.38,26.487 89.601,26.487 89.94,26.148 89.94,25.426 89.602,25.088 84.934,25.088 84.144,25.878 83.399,25.878 82.608,25.088 RL2H.8@81.202,25.088
  L6 w0.152: RL2H.8@81.202,25.088 82.538,25.088 83.342,25.892 89.8,25.892 90.604,25.088 R99H.1@92.698,25.088
DAC_OUT_N9: J1.43 R99I.1 RL2I.8 | length 52
  L1 w0.152: J1.43@1.179,32.011 3.294,32.011 4.297,31.008 5.743,31.008 6.479,31.744 9.252,31.744 9.431,31.923 15.187,37.679 27.093,37.679 27.432,37.34 27.432,36.618 27.094,36.28 22.426,36.28 21.636,37.07 20.891,37.07 20.1,36.28 RL2I.8@18.694,36.28
  L6 w0.152: RL2I.8@18.694,36.28 20.03,36.28 20.834,37.084 27.292,37.084 28.096,36.28 R99I.1@30.19,36.28
DAC_OUT_N10: J1.44 R99J.1 RL2J.8 | length 91.5
  L3 w0.152: J1.44@3.084,33.281 5.138,33.281 6.293,32.126 7.293,32.126 7.472,31.948 12.748,31.948 18.479,37.679 20.047,37.679 68.765,37.679 69.104,37.34 69.104,36.618 68.766,36.28 64.098,36.28 63.308,37.07 62.563,37.07 61.772,36.28 RL2J.8@60.366,36.28
  L6 w0.152: RL2J.8@60.366,36.28 61.702,36.28 62.506,37.084 68.964,37.084 69.768,36.28 R99J.1@71.862,36.28
DAC_OUT_N11: J1.45 R99K.1 RL2K.8 | length 74.1
  L1 w0.152: J1.45@1.179,34.551 3.294,34.551 4.297,33.548 5.743,33.548 6.708,34.513 8.608,34.513 8.786,34.692 14.579,40.484 22.403,40.484 23.703,39.184 29.203,39.184 30.708,37.679 47.929,37.679 48.268,37.34 48.268,36.618 47.93,36.28 43.262,36.28 42.472,37.07 41.727,37.07 40.936,36.28 RL2K.8@39.53,36.28
  L6 w0.152: RL2K.8@39.53,36.28 40.866,36.28 41.67,37.084 48.128,37.084 48.932,36.28 R99K.1@51.026,36.28
DAC_OUT_N12: J1.46 R99L.1 RL2L.8 | length 113.6
  L3 w0.152: J1.46@3.084,35.821 5.138,35.821 6.472,34.488 12.288,34.488 18.284,40.484 19.405,40.484 64.075,40.484 65.375,39.184 70.875,39.184 72.38,37.679 89.601,37.679 89.94,37.34 89.94,36.618 89.602,36.28 84.934,36.28 84.144,37.07 83.399,37.07 82.608,36.28 RL2L.8@81.202,36.28
  L6 w0.152: RL2L.8@81.202,36.28 82.538,36.28 83.342,37.084 89.8,37.084 90.604,36.28 R99L.1@92.698,36.28
DAC_OUT_N13: J1.47 R99M.1 RL2M.8 | length 55.2
  L1 w0.152: J1.47@1.179,37.091 3.294,37.091 4.297,36.088 5.743,36.088 6.708,37.053 8.097,37.053 8.276,37.232 10.879,39.835 10.879,41.006 18.743,48.871 27.093,48.871 27.432,48.532 27.432,47.81 27.094,47.472 22.426,47.472 21.636,48.262 20.891,48.262 20.1,47.472 RL2M.8@18.694,47.472
  L6 w0.152: RL2M.8@18.694,47.472 20.03,47.472 20.834,48.276 27.292,48.276 28.096,47.472 R99M.1@30.19,47.472
DAC_OUT_N14: J1.48 R99N.1 RL2N.8 | length 97.3
  L3 w0.152: J1.48@3.084,38.361 5.138,38.361 6.382,37.117 7.382,37.117 7.472,37.028 11.459,37.028 16.9,42.469 16.9,48 17.771,48.871 19.933,48.871 68.765,48.871 69.104,48.532 69.104,47.81 68.766,47.472 64.098,47.472 63.308,48.262 62.563,48.262 61.772,47.472 RL2N.8@60.366,47.472
  L6 w0.152: RL2N.8@60.366,47.472 61.702,47.472 62.506,48.276 68.964,48.276 69.768,47.472 R99N.1@71.862,47.472
DAC_OUT_N15: J1.49 R99O.1 RL2O.8 | length 77.3
  L1 w0.152: J1.49@1.179,39.631 3.294,39.631 4.297,38.628 5.743,38.628 6.708,39.593 7.707,39.593 7.886,39.772 8.994,40.88 8.994,42.081 18.588,51.676 22.403,51.676 23.703,50.376 29.203,50.376 30.708,48.871 47.929,48.871 48.268,48.532 48.268,47.81 47.93,47.472 43.262,47.472 42.472,48.262 41.727,48.262 40.936,47.472 RL2O.8@39.53,47.472
  L6 w0.152: RL2O.8@39.53,47.472 40.866,47.472 41.67,48.276 48.128,48.276 48.932,47.472 R99O.1@51.026,47.472
DAC_OUT_N16: J1.50 R99P.1 RL2P.8 | length 118.2
  L3 w0.152: J1.50@3.084,40.901 5.138,40.901 6.472,39.568 9.399,39.568 15.1,45.269 15.1,48.8 17.976,51.676 19.291,51.676 64.075,51.676 65.375,50.376 70.875,50.376 72.38,48.871 89.601,48.871 89.94,48.532 89.94,47.81 89.602,47.472 84.934,47.472 84.144,48.262 83.399,48.262 82.608,47.472 RL2P.8@81.202,47.472
  L6 w0.152: RL2P.8@81.202,47.472 82.538,47.472 83.342,48.276 89.8,48.276 90.604,47.472 R99P.1@92.698,47.472
DAC_OUT_N17: J1.53 R99Q.1 RL2Q.8 | length 58.8
  L1 w0.152: J1.53@1.179,44.711 3.294,44.711 4.297,43.708 5.743,43.708 6.708,44.673 7.905,44.673 8.084,44.852 16.821,53.59 17,53.768 17,58.6 18.463,60.063 27.093,60.063 27.432,59.724 27.432,59.002 27.094,58.664 22.426,58.664 21.636,59.454 20.891,59.454 20.1,58.664 RL2Q.8@18.694,58.664
  L6 w0.152: RL2Q.8@18.694,58.664 20.03,58.664 20.834,59.468 27.292,59.468 28.096,58.664 R99Q.1@30.19,58.664
DAC_OUT_N18: J1.54 R99R.1 RL2R.8 | length 98.8
  L3 w0.152: J1.54@3.084,45.981 5.175,45.981 6.204,44.953 6.204,44.916 6.472,44.648 8.579,44.648 16.9,52.969 16.9,58.5 18.463,60.063 20.827,60.063 68.765,60.063 69.104,59.724 69.104,59.002 68.766,58.664 64.098,58.664 63.308,59.454 62.563,59.454 61.772,58.664 RL2R.8@60.366,58.664
  L6 w0.152: RL2R.8@60.366,58.664 61.702,58.664 62.506,59.468 68.964,59.468 69.768,58.664 R99R.1@71.862,58.664
DAC_OUT_N19: J1.55 R99S.1 RL2S.8 | length 81.3
  L1 w0.152: J1.55@1.179,47.251 3.294,47.251 4.297,46.248 5.743,46.248 6.708,47.213 7.986,47.213 8.165,47.392 15.421,54.648 15.6,54.827 15.6,60.3 18.168,62.868 22.403,62.868 23.703,61.568 29.203,61.568 30.708,60.063 47.929,60.063 48.268,59.724 48.268,59.002 47.93,58.664 43.262,58.664 42.472,59.454 41.727,59.454 40.936,58.664 RL2S.8@39.53,58.664
  L6 w0.152: RL2S.8@39.53,58.664 40.866,58.664 41.67,59.468 48.128,59.468 48.932,58.664 R99S.1@51.026,58.664
DAC_OUT_N20: J1.56 R99T.1 RL2T.8 | length 121.6
  L3 w0.152: J1.56@3.084,48.521 5.175,48.521 6.204,47.493 6.204,47.456 6.472,47.188 9.319,47.188 15.6,53.469 15.6,60.2 18.268,62.868 19.543,62.868 64.075,62.868 65.375,61.568 70.875,61.568 72.38,60.063 89.601,60.063 89.94,59.724 89.94,59.002 89.602,58.664 84.934,58.664 84.144,59.454 83.399,59.454 82.608,58.664 RL2T.8@81.202,58.664
  L6 w0.152: RL2T.8@81.202,58.664 82.538,58.664 83.342,59.468 89.8,59.468 90.604,58.664 R99T.1@92.698,58.664
DAC_OUT_N21: J1.57 R99U.1 RL2U.8 | length 65.2
  L1 w0.152: J1.57@1.179,49.791 3.294,49.791 4.297,48.788 5.743,48.788 6.708,49.753 8.181,49.753 8.359,49.932 14.148,55.72 14.326,55.898 14.326,61.195 17.187,64.056 17.187,70.087 18.355,71.255 27.093,71.255 27.432,70.916 27.432,70.194 27.094,69.856 22.426,69.856 21.636,70.646 20.891,70.646 20.1,69.856 RL2U.8@18.694,69.856
  L6 w0.152: RL2U.8@18.694,69.856 20.03,69.856 20.834,70.66 27.292,70.66 28.096,69.856 R99U.1@30.19,69.856
DAC_OUT_N22: J1.58 R99V.1 RL2V.8 | length 105.7
  L3 w0.152: J1.58@3.084,51.061 5.175,51.061 6.204,50.033 6.204,49.996 6.472,49.728 9.959,49.728 14.3,54.069 14.3,61.169 17.2,64.069 17.2,70 18.455,71.255 18.924,71.255 68.765,71.255 69.104,70.916 69.104,70.194 68.766,69.856 64.098,69.856 63.308,70.646 62.563,70.646 61.772,69.856 RL2V.8@60.366,69.856
  L6 w0.152: RL2V.8@60.366,69.856 61.702,69.856 62.506,70.66 68.964,70.66 69.768,69.856 R99V.1@71.862,69.856
DAC_OUT_N23: J1.59 R99W.1 RL2W.8 | length 87.1
  L1 w0.152: J1.59@1.179,52.331 3.294,52.331 4.297,51.328 5.743,51.328 6.708,52.293 7.814,52.293 7.993,52.472 12.941,57.421 13.12,57.599 13.12,61.989 15.9,64.769 15.9,71.436 18.524,74.06 22.403,74.06 23.703,72.76 29.203,72.76 30.708,71.255 47.929,71.255 48.268,70.916 48.268,70.194 47.93,69.856 43.262,69.856 42.472,70.646 41.727,70.646 40.936,69.856 RL2W.8@39.53,69.856
  L6 w0.152: RL2W.8@39.53,69.856 40.866,69.856 41.67,70.66 48.128,70.66 48.932,69.856 R99W.1@51.026,69.856
DAC_OUT_N24: J1.60 R99X.1 RL2X.8 | length 128.2
  L3 w0.152: J1.60@3.084,53.601 5.175,53.601 6.204,52.573 6.204,52.536 6.472,52.268 10.399,52.268 13.1,54.969 13.1,61.969 15.9,64.769 15.9,71.4 18.56,74.06 19.268,74.06 64.075,74.06 65.375,72.76 70.875,72.76 72.38,71.255 89.601,71.255 89.94,70.916 89.94,70.194 89.602,69.856 84.934,69.856 84.144,70.646 83.399,70.646 82.608,69.856 RL2X.8@81.202,69.856
  L6 w0.152: RL2X.8@81.202,69.856 82.538,69.856 83.342,70.66 89.8,70.66 90.604,69.856 R99X.1@92.698,69.856
DAC_OUT_N25: J1.61 R99Y.1 RL2Y.8 | length 71.2
  L1 w0.152: J1.61@1.179,54.871 3.294,54.871 4.297,53.868 5.743,53.868 6.67,54.795 7.934,54.795 8.113,54.974 11.696,58.556 11.874,58.735 11.874,62.643 14.6,65.369 14.6,72.009 17.277,74.686 17.277,81.377 18.347,82.447 27.093,82.447 27.432,82.108 27.432,81.386 27.094,81.048 22.426,81.048 21.636,81.838 20.891,81.838 20.1,81.048 RL2Y.8@18.694,81.048
  L6 w0.152: RL2Y.8@18.694,81.048 20.03,81.048 20.834,81.852 27.292,81.852 28.096,81.048 R99Y.1@30.19,81.048
DAC_OUT_N26: J1.62 R99Z.1 RL2Z.8 | length 111.7
  L3 w0.152: J1.62@3.084,56.141 5.175,56.141 6.204,55.113 6.204,55.076 6.472,54.808 10.139,54.808 11.9,56.569 11.9,62.669 14.6,65.369 14.6,71.969 17.288,74.657 17.288,80.888 18.847,82.447 20.1,82.447 68.765,82.447 69.104,82.108 69.104,81.386 68.766,81.048 64.098,81.048 63.308,81.838 62.563,81.838 61.772,81.048 RL2Z.8@60.366,81.048
  L6 w0.152: RL2Z.8@60.366,81.048 61.702,81.048 62.506,81.852 68.964,81.852 69.768,81.048 R99Z.1@71.862,81.048
DAC_OUT_N27: J1.63 R99AA.1 RL2AA.8 | length 93.6
  L1 w0.152: J1.63@1.179,57.411 3.294,57.411 4.297,56.408 5.743,56.408 6.574,57.24 7.876,57.24 8.055,57.418 10.584,59.948 10.763,60.127 10.763,63.532 13.2,65.969 13.2,72.374 16.063,75.236 16.063,83.163 18.152,85.252 22.403,85.252 23.703,83.952 29.203,83.952 30.708,82.447 47.929,82.447 48.268,82.108 48.268,81.386 47.93,81.048 43.262,81.048 42.472,81.838 41.727,81.838 40.936,81.048 RL2AA.8@39.53,81.048
  L6 w0.152: RL2AA.8@39.53,81.048 40.866,81.048 41.67,81.852 48.128,81.852 48.932,81.048 R99AA.1@51.026,81.048
DAC_OUT_N28: J1.64 R99AB.1 RL2AB.8 | length 133.7
  L3 w0.152: J1.64@3.084,58.681 5.175,58.681 6.204,57.653 6.204,57.616 6.472,57.348 9.179,57.348 10.805,58.974 10.805,63.405 13.205,65.805 13.205,72.305 16.105,75.205 16.105,83.105 18.252,85.252 20.717,85.252 64.075,85.252 65.375,83.952 70.875,83.952 72.38,82.447 89.601,82.447 89.94,82.108 89.94,81.386 89.602,81.048 84.934,81.048 84.144,81.838 83.399,81.838 82.608,81.048 RL2AB.8@81.202,81.048
  L6 w0.152: RL2AB.8@81.202,81.048 82.538,81.048 83.342,81.852 89.8,81.852 90.604,81.048 R99AB.1@92.698,81.048
DAC_OUT_N29: J1.65 R99AC.1 RL2AC.8 | length 77.4
  L1 w0.152: J1.65@1.179,59.951 3.294,59.951 4.297,58.948 5.743,58.948 6.708,59.913 7.897,59.913 9.477,61.493 9.566,61.582 9.566,63.974 11.8,66.208 11.8,72.869 14.8,75.869 14.8,84.069 17.245,86.514 17.245,92.786 18.098,93.639 27.093,93.639 27.432,93.3 27.432,92.578 27.094,92.24 22.426,92.24 21.636,93.03 20.891,93.03 20.1,92.24 RL2AC.8@18.694,92.24
  L6 w0.152: RL2AC.8@18.694,92.24 20.03,92.24 20.834,93.044 27.292,93.044 28.096,92.24 R99AC.1@30.19,92.24
DAC_OUT_N30: J1.66 R99AD.1 RL2AD.8 | length 116.7
  L3 w0.152: J1.66@3.084,61.221 5.175,61.221 6.204,60.193 6.204,60.156 6.472,59.888 8.319,59.888 9.605,61.174 9.605,64.005 11.805,66.205 11.805,72.905 14.805,75.905 14.805,84.005 17.305,86.505 17.305,92.109 18.834,93.639 68.765,93.639 69.104,93.3 69.104,92.578 68.766,92.24 64.098,92.24 63.308,93.03 62.563,93.03 61.772,92.24 RL2AD.8@60.366,92.24
  L6 w0.152: RL2AD.8@60.366,92.24 61.702,92.24 62.506,93.044 68.964,93.044 69.768,92.24 R99AD.1@71.862,92.24
DAC_OUT_N31: J1.67 R99AE.1 RL2AE.8 | length 103.6
  L1 w0.152: J1.67@1.179,62.491 3.294,62.491 4.297,61.488 5.743,61.488 6.479,62.224 7.509,62.224 8.343,63.059 8.343,72.557 6.8,74.1 6.2,74.7 6.2,90.5 7.135,91.435 13.971,91.435 17.476,94.94 29.407,94.94 30.708,93.639 47.929,93.639 48.268,93.3 48.268,92.578 47.93,92.24 43.262,92.24 42.472,93.03 41.727,93.03 40.936,92.24 RL2AE.8@39.53,92.24
  L6 w0.152: RL2AE.8@39.53,92.24 40.866,92.24 41.67,93.044 48.128,93.044 48.932,92.24 R99AE.1@51.026,92.24
DAC_OUT_N32: J1.68 R99AF.1 RL2AF.8 | length 143.3
  L3 w0.152: J1.68@3.084,63.761 5.175,63.761 6.204,62.733 6.204,62.696 6.472,62.428 7.786,62.428 8.499,63.14 8.499,72.233 6.3,74.431 6.3,90.5 10.9,95.1 78.2,95.1 79.501,93.799 89.725,93.799 90.064,93.46 90.064,92.738 89.726,92.4 85.058,92.4 84.268,93.19 83.523,93.19 82.732,92.4 RL2AF.8@81.326,92.4
  L6 w0.152: RL2AF.8@81.202,92.24 82.538,92.24 83.342,93.044 89.8,93.044 90.604,92.24 R99AF.1@92.698,92.24
DAC_OUT_P1: J1.1 R98A.1 RL2A.5 | length 49.7
  L1 w0.152: J1.1@4.989,21.851 4.989,21.545 4.415,20.971 4.415,20.421 7.367,17.47 9.237,15.599 27.219,15.599 27.736,15.083 27.736,14.234 28.074,13.896 32.742,13.896 33.532,14.686 34.277,14.686 35.068,13.896 RL2A.5@36.474,13.896
  L6 w0.152: R98A.1@24.978,13.896 27.072,13.896 27.876,13.092 34.334,13.092 35.138,13.896 RL2A.5@36.474,13.896
DAC_OUT_P2: J1.2 R98B.1 RL2B.5 | length 91.6
  L3 w0.152: 5.925,21.064 5.836,21.153 5.836,21.279 6.65,22.093 6.65,22.876 J1.2@6.894,23.121 ; 5.97,21.018 6.142,20.847 6.142,19.758 6.492,19.408 6.6,19.3 10.301,15.599 18.6,15.599 68.891,15.599 69.408,15.083 69.408,14.234 69.746,13.896 74.414,13.896 75.204,14.686 75.949,14.686 76.74,13.896 RL2B.5@78.146,13.896
  L6 w0.152: R98B.1@66.65,13.896 68.744,13.896 69.548,13.092 76.006,13.092 76.81,13.896 RL2B.5@78.146,13.896
DAC_OUT_P3: J1.3 R98C.1 RL2C.5 | length 70.3
  L1 w0.152: J1.3@4.989,24.391 5.381,24.391 5.767,24.005 5.929,24.005 6.353,24.429 8.436,24.429 9.883,22.983 14.461,18.405 22.529,18.405 23.226,17.708 23.334,17.6 23.829,17.105 29.329,17.105 29.926,16.508 30.034,16.4 30.835,15.599 48.055,15.599 48.572,15.083 48.572,14.234 48.91,13.896 53.578,13.896 54.368,14.686 55.113,14.686 55.904,13.896 RL2C.5@57.31,13.896
  L6 w0.152: R98C.1@45.814,13.896 47.908,13.896 48.712,13.092 55.17,13.092 55.974,13.896 RL2C.5@57.31,13.896
DAC_OUT_P4: J1.4 R98D.1 RL2D.5 | length 110.3
  L3 w0.152: J1.4@6.894,25.661 6.894,25.538 7.8,24.633 8.898,24.633 15.126,18.405 18.885,18.405 64.201,18.405 64.898,17.708 65.006,17.6 65.501,17.105 71.001,17.105 71.598,16.508 71.706,16.4 72.507,15.599 89.727,15.599 90.244,15.083 90.244,14.234 90.582,13.896 95.25,13.896 96.04,14.686 96.785,14.686 97.576,13.896 RL2D.5@98.982,13.896
  L6 w0.152: R98D.1@87.486,13.896 89.58,13.896 90.384,13.092 96.842,13.092 97.646,13.896 RL2D.5@98.982,13.896
DAC_OUT_P5: J1.5 R98E.1 RL2E.5 | length 45.9
  L1 w0.152: J1.5@4.989,26.931 5.381,26.931 5.767,26.545 5.929,26.545 6.353,26.969 8.683,26.969 8.861,26.791 27.219,26.791 27.736,26.275 27.736,25.426 28.074,25.088 32.742,25.088 33.532,25.878 34.277,25.878 35.068,25.088 RL2E.5@36.474,25.088
  L6 w0.152: R98E.1@24.978,25.088 27.072,25.088 27.876,24.284 34.334,24.284 35.138,25.088 RL2E.5@36.474,25.088
DAC_OUT_P6: J1.6 R98F.1 RL2F.5 | length 86.1
  L3 w0.152: J1.6@6.894,28.201 6.894,27.814 7.917,26.791 17.924,26.791 68.891,26.791 69.408,26.275 69.408,25.426 69.746,25.088 74.414,25.088 75.204,25.878 75.949,25.878 76.74,25.088 RL2F.5@78.146,25.088
  L6 w0.152: R98F.1@66.65,25.088 68.744,25.088 69.548,24.284 76.006,24.284 76.81,25.088 RL2F.5@78.146,25.088
DAC_OUT_P7: J1.7 R98G.1 RL2G.5 | length 67.9
  L1 w0.152: J1.7@4.989,29.471 5.381,29.471 5.767,29.085 5.929,29.085 6.44,29.597 22.529,29.597 23.226,28.9 23.334,28.792 23.829,28.297 29.329,28.297 29.926,27.7 30.034,27.592 30.835,26.791 48.055,26.791 48.572,26.275 48.572,25.426 48.91,25.088 53.578,25.088 54.368,25.878 55.113,25.878 55.904,25.088 RL2G.5@57.31,25.088
  L6 w0.152: R98G.1@45.814,25.088 47.908,25.088 48.712,24.284 55.17,24.284 55.974,25.088 RL2G.5@57.31,25.088
DAC_OUT_P8: J1.8 R98H.1 RL2H.5 | length 108.8
  L3 w0.152: J1.8@6.895,30.741 6.895,30.35 6.509,29.964 6.509,29.802 6.714,29.597 17.3,29.597 64.201,29.597 64.898,28.9 65.006,28.792 65.501,28.297 71.001,28.297 71.598,27.7 71.706,27.592 72.507,26.791 89.727,26.791 90.244,26.275 90.244,25.426 90.582,25.088 95.25,25.088 96.04,25.878 96.785,25.878 97.576,25.088 RL2H.5@98.982,25.088
  L6 w0.152: R98H.1@87.486,25.088 89.58,25.088 90.384,24.284 96.842,24.284 97.646,25.088 RL2H.5@98.982,25.088
DAC_OUT_P9: J1.9 R98I.1 RL2I.5 | length 48.3
  L1 w0.152: J1.9@4.989,32.011 5.381,32.011 5.767,31.625 5.929,31.625 6.353,32.049 9.126,32.049 15.06,37.983 27.219,37.983 27.736,37.467 27.736,36.618 28.074,36.28 32.742,36.28 33.532,37.07 34.277,37.07 35.068,36.28 RL2I.5@36.474,36.28
  L6 w0.152: R98I.1@24.978,36.28 27.072,36.28 27.876,35.476 34.334,35.476 35.138,36.28 RL2I.5@36.474,36.28
DAC_OUT_P10: J1.10 R98J.1 RL2J.5 | length 88.3
  L3 w0.152: J1.10@6.894,33.281 6.894,32.956 7.598,32.253 12.622,32.253 18.352,37.983 20.047,37.983 68.891,37.983 69.408,37.467 69.408,36.618 69.746,36.28 74.414,36.28 75.204,37.07 75.949,37.07 76.74,36.28 RL2J.5@78.146,36.28
  L6 w0.152: R98J.1@66.65,36.28 68.744,36.28 69.548,35.476 76.006,35.476 76.81,36.28 RL2J.5@78.146,36.28
DAC_OUT_P11: J1.11 R98K.1 RL2K.5 | length 70.4
  L1 w0.152: J1.11@4.989,34.551 5.381,34.551 5.767,34.165 5.929,34.165 6.582,34.818 8.482,34.818 14.452,40.789 22.529,40.789 23.226,40.092 23.334,39.984 23.829,39.489 29.329,39.489 29.926,38.892 30.034,38.784 30.835,37.983 48.055,37.983 48.572,37.467 48.572,36.618 48.91,36.28 53.578,36.28 54.368,37.07 55.113,37.07 55.904,36.28 RL2K.5@57.31,36.28
  L6 w0.152: R98K.1@45.814,36.28 47.908,36.28 48.712,35.476 55.17,35.476 55.974,36.28 RL2K.5@57.31,36.28
DAC_OUT_P12: J1.12 R98L.1 RL2L.5 | length 110.3
  L3 w0.152: J1.12@6.894,35.821 6.894,35.698 7.8,34.793 12.162,34.793 18.158,40.789 19.405,40.789 64.201,40.789 64.898,40.092 65.006,39.984 65.501,39.489 71.001,39.489 71.598,38.892 71.706,38.784 72.507,37.983 89.727,37.983 90.244,37.467 90.244,36.618 90.582,36.28 95.25,36.28 96.04,37.07 96.785,37.07 97.576,36.28 RL2L.5@98.982,36.28
  L6 w0.152: R98L.1@87.486,36.28 89.58,36.28 90.384,35.476 96.842,35.476 97.646,36.28 RL2L.5@98.982,36.28
DAC_OUT_P13: J1.13 R98M.1 RL2M.5 | length 51.5
  L1 w0.152: J1.13@4.989,37.091 5.381,37.091 5.767,36.705 5.929,36.705 6.582,37.358 7.971,37.358 10.574,39.961 10.574,41.133 18.617,49.175 27.219,49.175 27.736,48.659 27.736,47.81 28.074,47.472 32.742,47.472 33.532,48.262 34.277,48.262 35.068,47.472 RL2M.5@36.474,47.472
  L6 w0.152: R98M.1@24.978,47.472 27.072,47.472 27.876,46.668 34.334,46.668 35.138,47.472 RL2M.5@36.474,47.472